# Altium PCB main_ADC_PCB.PcbDoc (part 8 of 8)
Units mm, origin at the board's own origin, x right, y up, seen from the top; angles counter-clockwise.
Board outline 150 x 100 mm, 4 copper layers (Top Layer, Layer 1, Layer 2, Bottom Layer), stack 1.62 mm thick; 535 components, 354 nets, 1725 pads, 1075 vias.
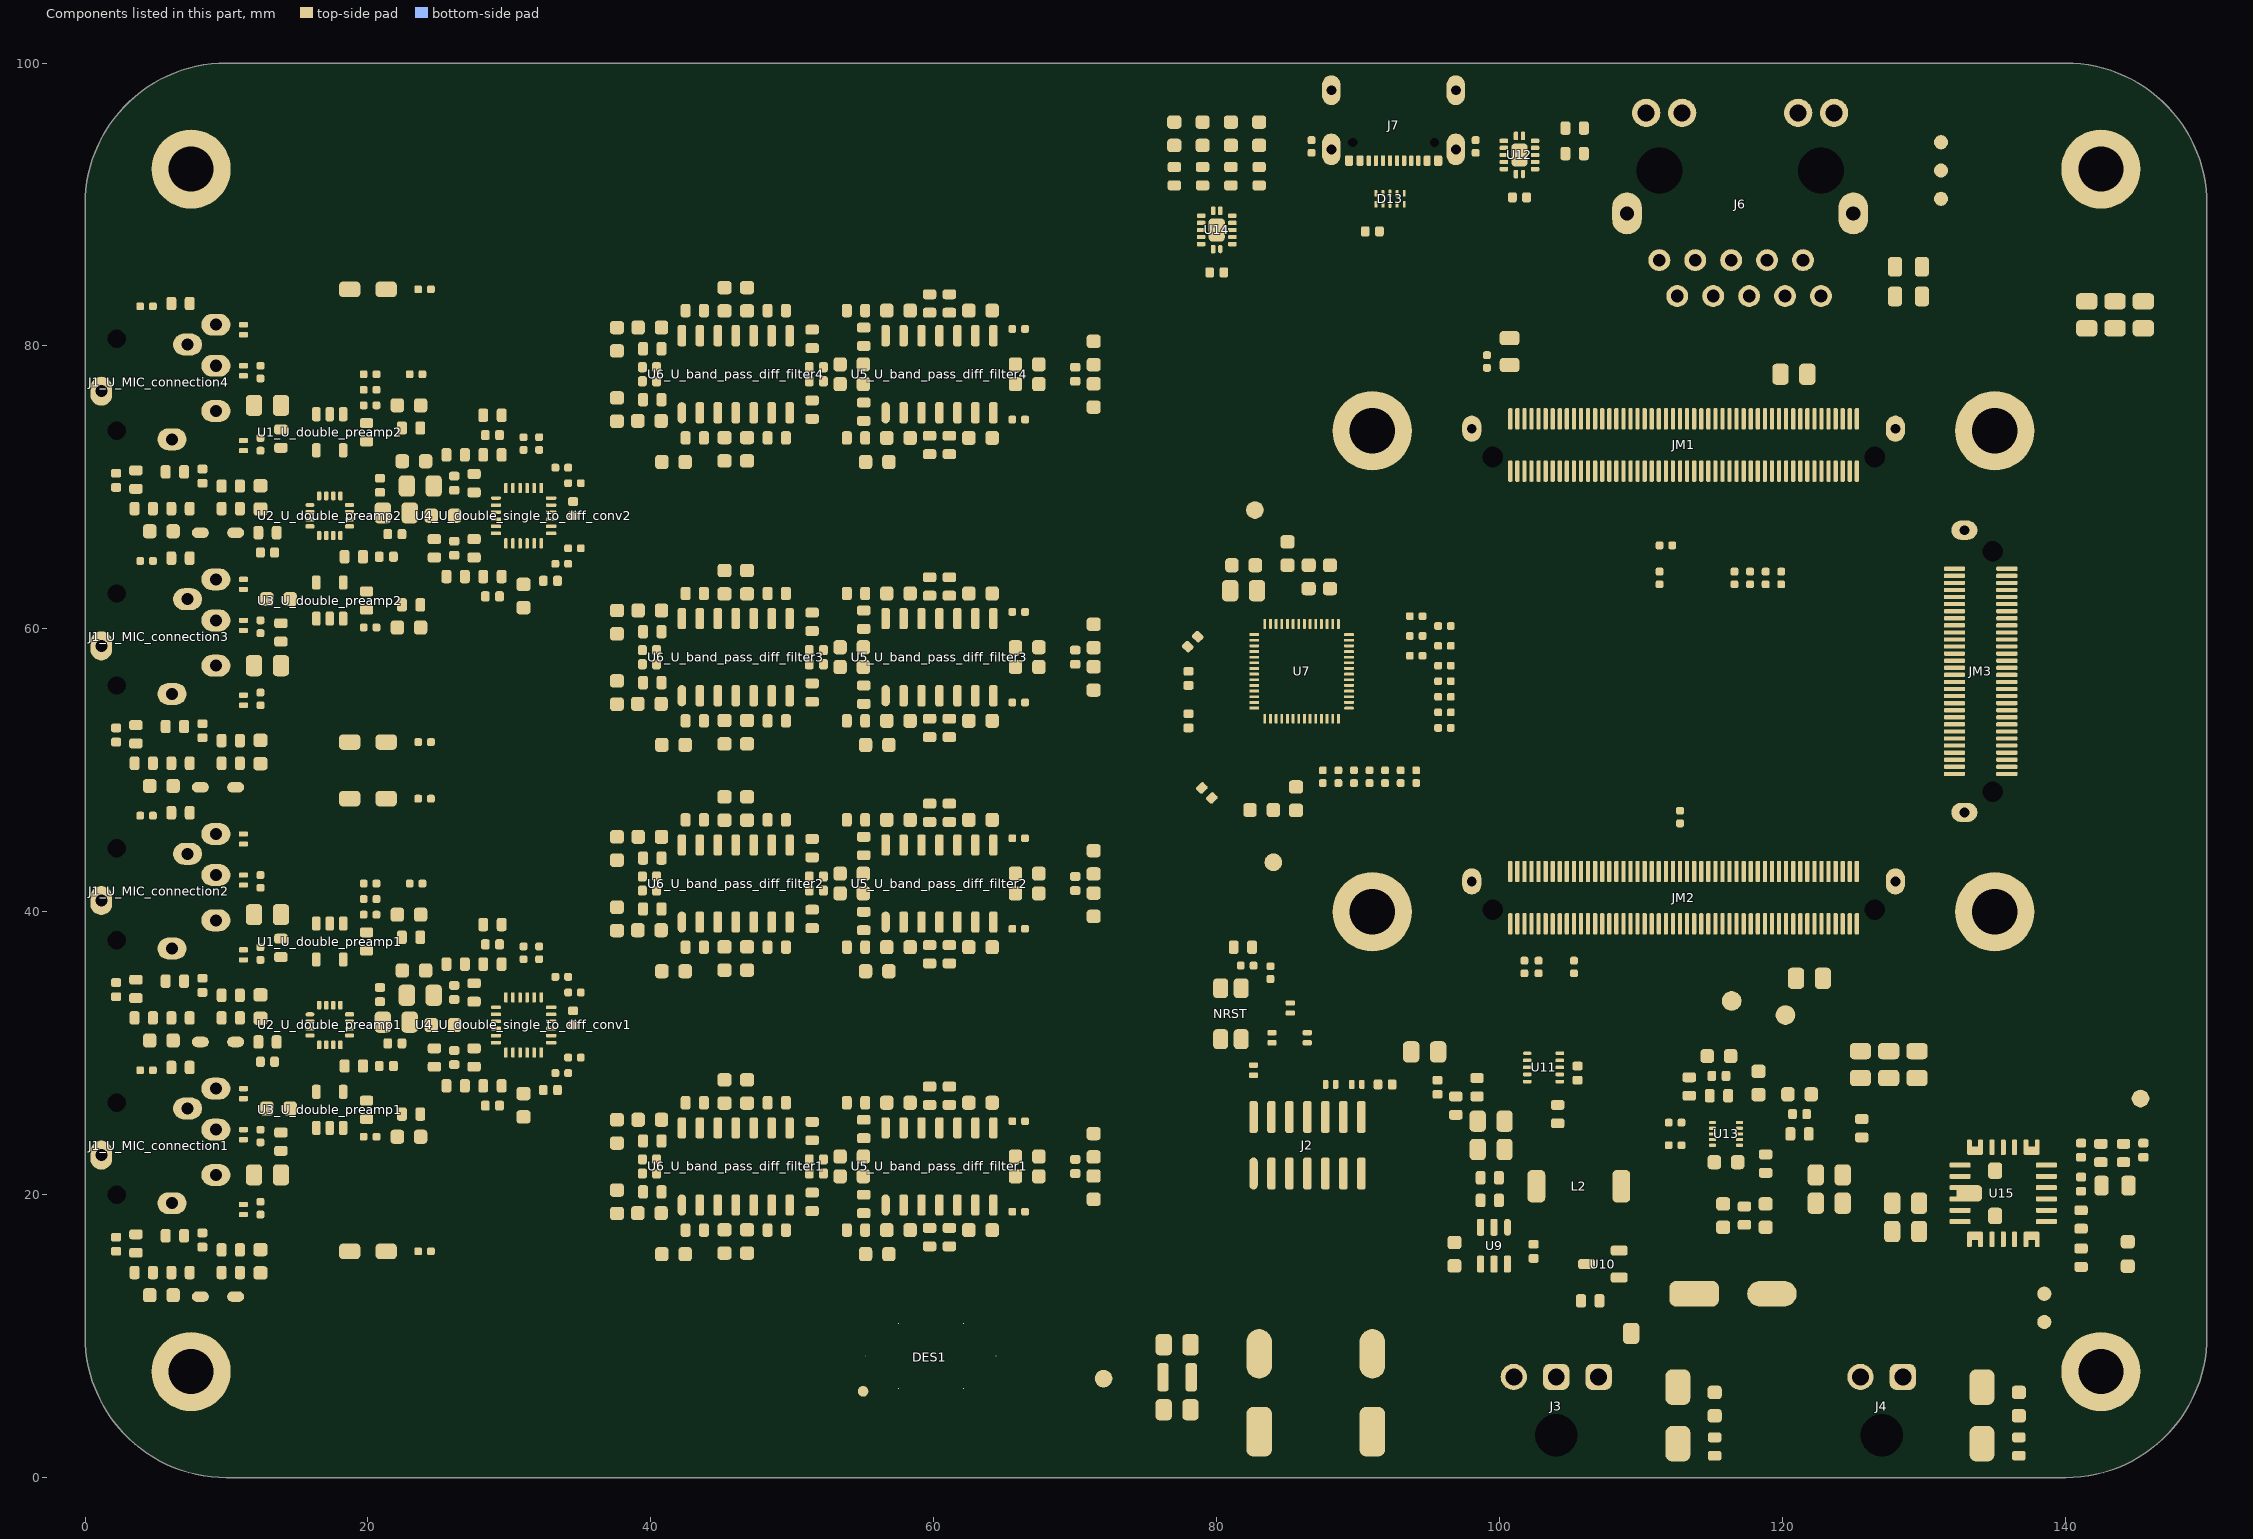
[diagram p10: the components of this part, seen from the top]

## Polygon pours and split planes (outlines as drawn) (continued)
12V_MIC on Layer 1 "12V_MIC_L02_P378" (solid, pour order 378): 2.3,29.2 3.1,29.2 cw(c3.1,28.9) 3.4,28.9 3.4,28.7 cw(c3.1,28.7) 3.1,28.4 2.3,28.4 cw(c2.3,28.7) 2,28.7 2,28.9 cw(c2.3,28.9)
12V_MIC on Layer 1 "12V_MIC_L02_P377" (solid, pour order 377): 2.3,47.2 3.1,47.2 cw(c3.1,46.9) 3.4,46.9 3.4,46.7 cw(c3.1,46.7) 3.1,46.4 2.3,46.4 cw(c2.3,46.7) 2,46.7 2,46.9 cw(c2.3,46.9)
12V_MIC on Layer 1 "12V_MIC_L02_P376" (solid, pour order 376): 2.3,65.2 3.1,65.2 cw(c3.1,64.9) 3.4,64.9 3.4,64.7 cw(c3.1,64.7) 3.1,64.4 2.3,64.4 cw(c2.3,64.7) 2,64.7 2,64.9 cw(c2.3,64.9)
12V_MIC on Layer 1 "12V_MIC_L02_P375" (solid, pour order 375): 2.3,83.2 3.1,83.2 cw(c3.1,82.9) 3.4,82.9 3.4,82.7 cw(c3.1,82.7) 3.1,82.4 2.3,82.4 cw(c2.3,82.7) 2,82.7 2,82.9 cw(c2.3,82.9)
3.3VD on Layer 1 "3.3VD_L02_P374" (solid, pour order 374): 32.5,55.1 32.5,54.2 ccw(c32.9,54.2) 32.9,53.8 34.5,53.8 ccw(c34.5,54.2) 34.9,54.2 34.9,55.1 ccw(c34.5,55.1) 34.5,55.5 32.9,55.5 ccw(c32.9,55.1)
3.3VD on Layer 1 "3.3VD_L02_P373" (solid, pour order 373): 32.5,45.8 32.5,44.9 ccw(c32.9,44.9) 32.9,44.5 34.5,44.5 ccw(c34.5,44.9) 34.9,44.9 34.9,45.8 ccw(c34.5,45.8) 34.5,46.2 32.9,46.2 ccw(c32.9,45.8)
VOCM on Layer 1 "VOCM_L02_P347" (solid, pour order 347): 54,81.4 54,80.2 cw(c53.7,80.2) 53.7,79.9 52.4,79.9 cw(c52.4,80.2) 52.1,80.2 52.1,81.4 cw(c52.4,81.4) 52.4,81.7 53.7,81.7 cw(c53.7,81.4)
VOCM on Layer 1 "VOCM_L02_P346" (solid, pour order 346): 54,74.6 54,75.8 ccw(c53.7,75.8) 53.7,76.1 52.4,76.1 ccw(c52.4,75.8) 52.1,75.8 52.1,74.6 ccw(c52.4,74.6) 52.4,74.3 53.7,74.3 ccw(c53.7,74.6)
VOCM on Layer 1 "VOCM_L02_P344" (solid, pour order 344): 66,79.8 66,80.2 cw(c66.3,80.2) 66.3,80.5 67.5,80.5 cw(c67.5,80.2) 67.8,80.2 67.8,79.8 cw(c67.5,79.8) 67.5,79.5 66.3,79.5 cw(c66.3,79.8)
VOCM on Layer 1 "VOCM_L02_P325" (solid, pour order 325): 66,75.8 66,76.2 cw(c66.3,76.2) 66.3,76.5 67.5,76.5 cw(c67.5,76.2) 67.8,76.2 67.8,75.8 cw(c67.5,75.8) 67.5,75.5 66.3,75.5 cw(c66.3,75.8)
VOCM on Layer 1 "VOCM_L02_P324" (solid, pour order 324): 38.3,78.9 38.7,78.9 cw(c38.7,78.6) 39,78.6 39,77.4 cw(c38.7,77.4) 38.7,77.1 38.3,77.1 cw(c38.3,77.4) 38,77.4 38,78.6 cw(c38.3,78.6)
VOCM on Layer 1 "VOCM_L02_P323" (solid, pour order 323): 83.6,51.4 84.4,51.4 cw(c84.4,51.1) 84.7,51.1 84.7,49.1 cw(c84.4,49.1) 84.4,48.8 83.6,48.8 cw(c83.6,49.1) 83.3,49.1 83.3,51.1 cw(c83.6,51.1)
VOCM on Layer 1 "VOCM_L02_P322" (solid, pour order 322): 39.4,69.4 39.6,69.4 cw(c39.6,69.1) 39.9,69.1 39.9,66.9 cw(c39.6,66.9) 39.6,66.6 39.4,66.6 cw(c39.4,66.9) 39.1,66.9 39.1,69.1 cw(c39.4,69.1)
VOCM on Layer 1 "VOCM_L02_P321" (solid, pour order 321): 35.3,69.4 35.5,69.4 cw(c35.5,69.1) 35.8,69.1 35.8,66.9 cw(c35.5,66.9) 35.5,66.6 35.3,66.6 cw(c35.3,66.9) 35,66.9 35,69.1 cw(c35.3,69.1)
VOCM on Layer 1 "VOCM_L02_P320" (solid, pour order 320): 19.3,27.8 19.3,28.2 cw(c19.6,28.2) 19.6,28.5 20.8,28.5 cw(c20.8,28.2) 21.1,28.2 21.1,27.8 cw(c20.8,27.8) 20.8,27.5 19.6,27.5 cw(c19.6,27.8)
VOCM on Layer 1 "VOCM_L02_P315" (solid, pour order 315): 19.3,27.8 19.3,28.2 cw(c19.6,28.2) 19.6,28.5 20.8,28.5 cw(c20.8,28.2) 21.1,28.2 21.1,27.8 cw(c20.8,27.8) 20.8,27.5 19.6,27.5 cw(c19.6,27.8)
VOCM on Layer 1 "VOCM_L02_P314" (solid, pour order 314): 39.4,33.4 39.6,33.4 cw(c39.6,33.1) 39.9,33.1 39.9,30.9 cw(c39.6,30.9) 39.6,30.6 39.4,30.6 cw(c39.4,30.9) 39.1,30.9 39.1,33.1 cw(c39.4,33.1)
VOCM on Layer 1 "VOCM_L02_P310" (solid, pour order 310): 35.3,33.4 35.5,33.4 cw(c35.5,33.1) 35.8,33.1 35.8,30.9 cw(c35.5,30.9) 35.5,30.6 35.3,30.6 cw(c35.3,30.9) 35,30.9 35,33.1 cw(c35.3,33.1)
12V_MIC on Layer 1 "12V_MIC_L02_P309" (solid, pour order 309): 8.3,65.4 8.3,65.8 cw(c8.6,65.8) 8.6,66.1 9.8,66.1 cw(c9.8,65.8) 10.1,65.8 10.1,65.4 cw(c9.8,65.4) 9.8,65.1 8.6,65.1 cw(c8.6,65.4)
VOCM on Layer 1 "VOCM_L02_P308" (solid, pour order 308): 54,25.4 54,24.2 cw(c53.7,24.2) 53.7,23.9 52.4,23.9 cw(c52.4,24.2) 52.1,24.2 52.1,25.4 cw(c52.4,25.4) 52.4,25.7 53.7,25.7 cw(c53.7,25.4)
VOCM on Layer 1 "VOCM_L02_P307" (solid, pour order 307): 54,18.6 54,19.8 ccw(c53.7,19.8) 53.7,20.1 52.4,20.1 ccw(c52.4,19.8) 52.1,19.8 52.1,18.6 ccw(c52.4,18.6) 52.4,18.3 53.7,18.3 ccw(c53.7,18.6)
VOCM on Layer 1 "VOCM_L02_P260" (solid, pour order 260): 66,23.8 66,24.2 cw(c66.3,24.2) 66.3,24.5 67.5,24.5 cw(c67.5,24.2) 67.8,24.2 67.8,23.8 cw(c67.5,23.8) 67.5,23.5 66.3,23.5 cw(c66.3,23.8)
VOCM on Layer 1 "VOCM_L02_P252" (solid, pour order 252): 66,19.8 66,20.2 cw(c66.3,20.2) 66.3,20.5 67.5,20.5 cw(c67.5,20.2) 67.8,20.2 67.8,19.8 cw(c67.5,19.8) 67.5,19.5 66.3,19.5 cw(c66.3,19.8)
VOCM on Layer 1 "VOCM_L02_P251" (solid, pour order 251): 38.3,22.9 38.7,22.9 cw(c38.7,22.6) 39,22.6 39,21.4 cw(c38.7,21.4) 38.7,21.1 38.3,21.1 cw(c38.3,21.4) 38,21.4 38,22.6 cw(c38.3,22.6)
VOCM on Layer 1 "VOCM_L02_P250" (solid, pour order 250): 54,45.4 54,44.2 cw(c53.7,44.2) 53.7,43.9 52.4,43.9 cw(c52.4,44.2) 52.1,44.2 52.1,45.4 cw(c52.4,45.4) 52.4,45.7 53.7,45.7 cw(c53.7,45.4)
VOCM on Layer 1 "VOCM_L02_P249" (solid, pour order 249): 54,38.6 54,39.8 ccw(c53.7,39.8) 53.7,40.1 52.4,40.1 ccw(c52.4,39.8) 52.1,39.8 52.1,38.6 ccw(c52.4,38.6) 52.4,38.3 53.7,38.3 ccw(c53.7,38.6)
VOCM on Layer 1 "VOCM_L02_P247" (solid, pour order 247): 66,43.8 66,44.2 cw(c66.3,44.2) 66.3,44.5 67.5,44.5 cw(c67.5,44.2) 67.8,44.2 67.8,43.8 cw(c67.5,43.8) 67.5,43.5 66.3,43.5 cw(c66.3,43.8)
VOCM on Layer 1 "VOCM_L02_P246" (solid, pour order 246): 66,39.8 66,40.2 cw(c66.3,40.2) 66.3,40.5 67.5,40.5 cw(c67.5,40.2) 67.8,40.2 67.8,39.8 cw(c67.5,39.8) 67.5,39.5 66.3,39.5 cw(c66.3,39.8)
VOCM on Layer 1 "VOCM_L02_P245" (solid, pour order 245): 38.3,42.9 38.7,42.9 cw(c38.7,42.6) 39,42.6 39,41.4 cw(c38.7,41.4) 38.7,41.1 38.3,41.1 cw(c38.3,41.4) 38,41.4 38,42.6 cw(c38.3,42.6)
VOCM on Layer 1 "VOCM_L02_P244" (solid, pour order 244): 54,61.4 54,60.2 cw(c53.7,60.2) 53.7,59.9 52.4,59.9 cw(c52.4,60.2) 52.1,60.2 52.1,61.4 cw(c52.4,61.4) 52.4,61.7 53.7,61.7 cw(c53.7,61.4)
VOCM on Layer 1 "VOCM_L02_P243" (solid, pour order 243): 54,54.6 54,55.8 ccw(c53.7,55.8) 53.7,56.1 52.4,56.1 ccw(c52.4,55.8) 52.1,55.8 52.1,54.6 ccw(c52.4,54.6) 52.4,54.3 53.7,54.3 ccw(c53.7,54.6)
VOCM on Layer 1 "VOCM_L02_P241" (solid, pour order 241): 66,59.8 66,60.2 cw(c66.3,60.2) 66.3,60.5 67.5,60.5 cw(c67.5,60.2) 67.8,60.2 67.8,59.8 cw(c67.5,59.8) 67.5,59.5 66.3,59.5 cw(c66.3,59.8)
VOCM on Layer 1 "VOCM_L02_P240" (solid, pour order 240): 66,55.8 66,56.2 cw(c66.3,56.2) 66.3,56.5 67.5,56.5 cw(c67.5,56.2) 67.8,56.2 67.8,55.8 cw(c67.5,55.8) 67.5,55.5 66.3,55.5 cw(c66.3,55.8)
VOCM on Layer 1 "VOCM_L02_P239" (solid, pour order 239): 38.3,58.9 38.7,58.9 cw(c38.7,58.6) 39,58.6 39,57.4 cw(c38.7,57.4) 38.7,57.1 38.3,57.1 cw(c38.3,57.4) 38,57.4 38,58.6 cw(c38.3,58.6)
3.3VD on Layer 1 "3.3VD_L02_P238" (solid, pour order 238): 77.6,85.6 78.4,85.6 cw(c78.4,85.3) 78.7,85.3 78.7,85.1 cw(c78.4,85.1) 78.4,84.8 77.6,84.8 cw(c77.6,85.1) 77.3,85.1 77.3,85.3 cw(c77.6,85.3)
3.3VD on Layer 1 "3.3VD_L02_P237" (solid, pour order 237): 120.6,73.8 122.4,73.8 cw(c122.4,73.5) 122.7,73.5 122.7,72.5 cw(c122.4,72.5) 122.4,72.2 120.6,72.2 cw(c120.6,72.5) 120.3,72.5 120.3,73.5 cw(c120.6,73.5)
12V_MIC on Layer 1 "12V_MIC_L02_P235" (solid, pour order 235): 74,8.2 75.2,8.2 cw(c75.2,7.9) 75.5,7.9 75.5,4.1 cw(c75.2,4.1) 75.2,3.8 74,3.8 cw(c74,4.1) 73.7,4.1 73.7,7.9 cw(c74,7.9)
5VIN on Layer 1 "5VIN_L02_P199" (solid, pour order 199): 127.5,10.6 131.8,10.6 cw(c131.8,10.3) 132.1,10.3 132.1,6.3 cw(c131.6,6.3) 131.6,5.8 127.6,5.8 cw(c127.6,6.2) 127.2,6.2 127.2,10.3 cw(c127.5,10.3)
12VIN on Layer 1 "12VIN_L02_P188" (solid, pour order 188): 106.1,8.5 108.7,8.5 110.1,8.5 cw(c110.1,8) 110.6,8 110.6,6.3 cw(c110.1,6.3) 110.1,5.8 106.1,5.8 cw(c106.1,6.2) 105.7,6.2 105.7,8.1 cw(c106.1,8.1)
ETH_GND on Layer 1 "ETH_GND_L02_P180" (solid, pour order 180): 108,99.5 126,99.5 cw(c126,97) 128.5,97 128.5,83 cw(c126,83) 126,80.5 108,80.5 cw(c108,83) 105.5,83 105.5,97 cw(c108,97)
GND on Bottom Layer "GND_L04_P459" (solid, remove dead copper, pour order 459): 17 vertices, not listed, extent 1,1 149,99
5VA on Bottom Layer "5VA_L04_P076" (solid, pour order 76): 84.8,63.9 85.2,63.9 cw(c85.2,63.6) 85.5,63.6 85.5,62.2 cw(c85.2,62.2) 85.2,61.9 84.8,61.9 cw(c84.8,62.2) 84.5,62.2 84.5,63.6 cw(c84.8,63.6)
5VA on Bottom Layer "NONET_L03_P-001" (solid, pour order 146): 85.5,49.2 85.7,49.2 ccw(c85.7,49.5) 86,49.5 86,51.5 ccw(c85.7,51.5) 85.7,51.8 85.5,51.8 ccw(c85.5,51.5) 85.2,51.5 85.2,49.5 ccw(c85.5,49.5)
1.8VD on Bottom Layer "1.8VD_L04_P147" (solid, pour order 147): 122.4,46.3 123,46.3 cw(c123,46) 123.3,46 123.3,45.4 cw(c123,45.4) 123,45.1 122.4,45.1 cw(c122.4,45.4) 122.1,45.4 122.1,46 cw(c122.4,46)
ETH_GND on Bottom Layer "ETH_GND_L04_P164" (solid, pour order 164): 108,99.5 126,99.5 cw(c126,97) 128.5,97 128.5,83 cw(c126,83) 126,80.5 108,80.5 cw(c108,83) 105.5,83 105.5,97 cw(c108,97)
5VA on Bottom Layer "5VA_L04_P197" (solid, pour order 197): 20.2,35.7 20.2,35.9 cw(c20.5,35.9) 20.5,36.2 21.4,36.2 cw(c21.4,35.9) 21.7,35.9 21.7,35.7 cw(c21.4,35.7) 21.4,35.4 20.5,35.4 cw(c20.5,35.7)
5VA on Bottom Layer "5VA_L04_P194" (solid, pour order 194): 19.2,66.5 19.2,66.7 cw(c19.5,66.7) 19.5,67 20.4,67 cw(c20.4,66.7) 20.7,66.7 20.7,66.5 cw(c20.4,66.5) 20.4,66.2 19.5,66.2 cw(c19.5,66.5)
5VA on Bottom Layer "5VA_L04_P293" (solid, pour order 293): 43.125,71.4 43.125,72.2 cw(c43.425,72.2) 43.425,72.5 43.625,72.5 cw(c43.625,72.2) 43.925,72.2 43.925,71.4 cw(c43.625,71.4) 43.625,71.1 43.425,71.1 cw(c43.425,71.4)
5VA on Bottom Layer "5VA_L04_P209" (solid, pour order 209): 60,76.7 60,77.5 cw(c60.3,77.5) 60.3,77.8 60.5,77.8 cw(c60.5,77.5) 60.8,77.5 60.8,76.7 cw(c60.5,76.7) 60.5,76.4 60.3,76.4 cw(c60.3,76.7)
5VA on Bottom Layer "5VA_L04_P296" (solid, pour order 296): 57.525,71.4 57.525,72.2 cw(c57.825,72.2) 57.825,72.5 58.025,72.5 cw(c58.025,72.2) 58.325,72.2 58.325,71.4 cw(c58.025,71.4) 58.025,71.1 57.825,71.1 cw(c57.825,71.4)
5VA on Bottom Layer "5VA_L04_P210" (solid, pour order 210): 45.6,76.7 45.6,77.5 cw(c45.9,77.5) 45.9,77.8 46.1,77.8 cw(c46.1,77.5) 46.4,77.5 46.4,76.7 cw(c46.1,76.7) 46.1,76.4 45.9,76.4 cw(c45.9,76.7)
5VA on Bottom Layer "5VA_L04_P291" (solid, pour order 291): 43.125,51.4 43.125,52.2 cw(c43.425,52.2) 43.425,52.5 43.625,52.5 cw(c43.625,52.2) 43.925,52.2 43.925,51.4 cw(c43.625,51.4) 43.625,51.1 43.425,51.1 cw(c43.425,51.4)
5VA on Bottom Layer "5VA_L04_P214" (solid, pour order 214): 60,56.7 60,57.5 cw(c60.3,57.5) 60.3,57.8 60.5,57.8 cw(c60.5,57.5) 60.8,57.5 60.8,56.7 cw(c60.5,56.7) 60.5,56.4 60.3,56.4 cw(c60.3,56.7)
5VA on Bottom Layer "5VA_L04_P292" (solid, pour order 292): 57.525,51.4 57.525,52.2 cw(c57.825,52.2) 57.825,52.5 58.025,52.5 cw(c58.025,52.2) 58.325,52.2 58.325,51.4 cw(c58.025,51.4) 58.025,51.1 57.825,51.1 cw(c57.825,51.4)
5VA on Bottom Layer "5VA_L04_P211" (solid, pour order 211): 46.4,57.5 46.4,56.7 cw(c46.1,56.7) 46.1,56.4 45.9,56.4 cw(c45.9,56.7) 45.6,56.7 45.6,57.5 cw(c45.9,57.5) 45.9,57.8 46.1,57.8 cw(c46.1,57.5)
5VA on Bottom Layer "5VA_L04_P287" (solid, pour order 287): 42.9,35.4 42.9,36.2 cw(c43.2,36.2) 43.2,36.5 43.4,36.5 cw(c43.4,36.2) 43.7,36.2 43.7,35.4 cw(c43.4,35.4) 43.4,35.1 43.2,35.1 cw(c43.2,35.4)
5VA on Bottom Layer "5VA_L04_P223" (solid, pour order 223): 60,40.7 60,41.5 cw(c60.3,41.5) 60.3,41.8 60.5,41.8 cw(c60.5,41.5) 60.8,41.5 60.8,40.7 cw(c60.5,40.7) 60.5,40.4 60.3,40.4 cw(c60.3,40.7)
5VA on Bottom Layer "5VA_L04_P289" (solid, pour order 289): 57.525,35.4 57.525,36.2 cw(c57.825,36.2) 57.825,36.5 58.025,36.5 cw(c58.025,36.2) 58.325,36.2 58.325,35.4 cw(c58.025,35.4) 58.025,35.1 57.825,35.1 cw(c57.825,35.4)
5VA on Bottom Layer "5VA_L04_P215" (solid, pour order 215): 45.6,40.7 45.6,41.5 cw(c45.9,41.5) 45.9,41.8 46.1,41.8 cw(c46.1,41.5) 46.4,41.5 46.4,40.7 cw(c46.1,40.7) 46.1,40.4 45.9,40.4 cw(c45.9,40.7)
5VA on Bottom Layer "5VA_L04_P285" (solid, pour order 285): 43.125,15.4 43.125,16.2 cw(c43.425,16.2) 43.425,16.5 43.625,16.5 cw(c43.625,16.2) 43.925,16.2 43.925,15.4 cw(c43.625,15.4) 43.625,15.1 43.425,15.1 cw(c43.425,15.4)
5VA on Bottom Layer "5VA_L04_P254" (solid, pour order 254): 60.8,21.5 60.8,20.7 cw(c60.5,20.7) 60.5,20.4 60.3,20.4 cw(c60.3,20.7) 60,20.7 60,21.5 cw(c60.3,21.5) 60.3,21.8 60.5,21.8 cw(c60.5,21.5)
5VA on Bottom Layer "5VA_L04_P283" (solid, pour order 283): 57.525,15.4 57.525,16.2 cw(c57.825,16.2) 57.825,16.5 58.025,16.5 cw(c58.025,16.2) 58.325,16.2 58.325,15.4 cw(c58.025,15.4) 58.025,15.1 57.825,15.1 cw(c57.825,15.4)
5VA on Bottom Layer "5VA_L04_P226" (solid, pour order 226): 46.4,21.5 46.4,20.7 cw(c46.1,20.7) 46.1,20.4 45.9,20.4 cw(c45.9,20.7) 45.6,20.7 45.6,21.5 cw(c45.9,21.5) 45.9,21.8 46.1,21.8 cw(c46.1,21.5)
5VA on Bottom Layer "5VA_L04_P262" (solid, pour order 262): 13.6,63.1 13.6,63.5 cw(c13.9,63.5) 13.9,63.8 15.1,63.8 cw(c15.1,63.5) 15.4,63.5 15.4,63.1 cw(c15.1,63.1) 15.1,62.8 13.9,62.8 cw(c13.9,63.1)
5VA on Bottom Layer "5VA_L04_P193" (solid, pour order 193): 20.2,71.7 20.2,71.9 cw(c20.5,71.9) 20.5,72.2 21.4,72.2 cw(c21.4,71.9) 21.7,71.9 21.7,71.7 cw(c21.4,71.7) 21.4,71.4 20.5,71.4 cw(c20.5,71.7)
3.3VD on Bottom Layer "3.3VD_L04_P277" (solid, pour order 277): 21.7,70.9 21.8,70.9 cw(c21.8,70.6) 22.1,70.6 22.1,69.6 cw(c21.8,69.6) 21.8,69.3 21.7,69.3 cw(c21.7,69.6) 21.4,69.6 21.4,70.6 cw(c21.7,70.6)
5VA on Bottom Layer "5VA_L04_P196" (solid, pour order 196): 31.1,63.8 30.9,63.8 cw(c30.9,64.1) 30.6,64.1 30.6,65 cw(c30.9,65) 30.9,65.3 31.1,65.3 cw(c31.1,65) 31.4,65 31.4,64.1 cw(c31.1,64.1)
5VA on Bottom Layer "5VA_L04_P195" (solid, pour order 195): 26.8,67.9 26.8,68.1 cw(c27.1,68.1) 27.1,68.4 28,68.4 cw(c28,68.1) 28.3,68.1 28.3,67.9 cw(c28,67.9) 28,67.6 27.1,67.6 cw(c27.1,67.9)
VOCM on Bottom Layer "VOCM_L04_P261" (solid, pour order 261): 19.3,63.8 19.3,64.2 cw(c19.6,64.2) 19.6,64.5 20.8,64.5 cw(c20.8,64.2) 21.1,64.2 21.1,63.8 cw(c20.8,63.8) 20.8,63.5 19.6,63.5 cw(c19.6,63.8)
3.3VD on Bottom Layer "3.3VD_L04_P265" (solid, pour order 265): 21.7,34.9 21.8,34.9 cw(c21.8,34.6) 22.1,34.6 22.1,33.6 cw(c21.8,33.6) 21.8,33.3 21.7,33.3 cw(c21.7,33.6) 21.4,33.6 21.4,34.6 cw(c21.7,34.6)
5VA on Bottom Layer "5VA_L04_P264" (solid, pour order 264): 13.6,27.1 13.6,27.5 cw(c13.9,27.5) 13.9,27.8 15.1,27.8 cw(c15.1,27.5) 15.4,27.5 15.4,27.1 cw(c15.1,27.1) 15.1,26.8 13.9,26.8 cw(c13.9,27.1)
5VA on Bottom Layer "5VA_L04_P201" (solid, pour order 201): 31.1,27.8 30.9,27.8 cw(c30.9,28.1) 30.6,28.1 30.6,29 cw(c30.9,29) 30.9,29.3 31.1,29.3 cw(c31.1,29) 31.4,29 31.4,28.1 cw(c31.1,28.1)
5VA on Bottom Layer "5VA_L04_P200" (solid, pour order 200): 26.8,31.9 26.8,32.1 cw(c27.1,32.1) 27.1,32.4 28,32.4 cw(c28,32.1) 28.3,32.1 28.3,31.9 cw(c28,31.9) 28,31.6 27.1,31.6 cw(c27.1,31.9)
5VA on Bottom Layer "5VA_L04_P198" (solid, pour order 198): 19.2,30.5 19.2,30.7 cw(c19.5,30.7) 19.5,31 20.4,31 cw(c20.4,30.7) 20.7,30.7 20.7,30.5 cw(c20.4,30.5) 20.4,30.2 19.5,30.2 cw(c19.5,30.5)
3.3VD on Bottom Layer "3.3VD_L04_P207" (solid, pour order 207): 79.1,37.4 79.1,37.6 cw(c79.4,37.6) 79.4,37.9 80.3,37.9 cw(c80.3,37.6) 80.6,37.6 80.6,37.4 cw(c80.3,37.4) 80.3,37.1 79.4,37.1 cw(c79.4,37.4)
1.8VD on Bottom Layer "1.8VD_L04_P256" (solid, pour order 256): 89.3,63.5 89.9,63.5 cw(c89.9,63.2) 90.2,63.2 90.2,62.6 cw(c89.9,62.6) 89.9,62.3 89.3,62.3 cw(c89.3,62.6) 89,62.6 89,63.2 cw(c89.3,63.2)
3.3VD on Bottom Layer "3.3VD_L04_P458" (solid, pour order 458): 78.4,84.8 77.6,84.8 cw(c77.6,85.1) 77.3,85.1 77.3,85.3 cw(c77.6,85.3) 77.6,85.6 78.4,85.6 cw(c78.4,85.3) 78.7,85.3 78.7,85.1 cw(c78.4,85.1)
3.3VD on Bottom Layer "3.3VD_L04_P192" (solid, pour order 192): 101.9,81.3 102.1,81.3 cw(c102.1,81) 102.4,81 102.4,80.1 cw(c102.1,80.1) 102.1,79.8 101.9,79.8 cw(c101.9,80.1) 101.6,80.1 101.6,81 cw(c101.9,81)
3.3VD on Bottom Layer "3.3VD_L04_P203" (solid, pour order 203): 99.8,90.1 99,90.1 cw(c99,90.4) 98.7,90.4 98.7,90.6 cw(c99,90.6) 99,90.9 99.8,90.9 cw(c99.8,90.6) 100.1,90.6 100.1,90.4 cw(c99.8,90.4)
3.3VD on Bottom Layer "3.3VD_L04_P202" (solid, pour order 202): 123.3,63.2 123.3,63 cw(c123,63) 123,62.7 120.7,62.7 cw(c120.7,63) 120.4,63 120.4,63.2 cw(c120.7,63.2) 120.7,63.5 123,63.5 cw(c123,63.2)
3.3VD on Bottom Layer "3.3VD_L04_P191" (solid, pour order 191): 124.3,46.4 125.8,46.4 cw(c125.8,46.2) 126,46.2 126,44 cw(c125.8,44) 125.8,43.8 124.3,43.8 cw(c124.3,44) 124.1,44 124.1,46.2 cw(c124.3,46.2)
5VA on Bottom Layer "5VA_L04_P190" (solid, pour order 190): 97.2,31.2 99.5,31.2 cw(c99.5,30.9) 99.8,30.9 99.8,29.3 cw(c99.5,29.3) 99.5,29 97.2,29 cw(c97.2,29.3) 96.9,29.3 96.9,30.9 cw(c97.2,30.9)
1.8VD on Bottom Layer "1.8VD_L04_P186" (solid, pour order 186): 119.6,30.8 120.8,30.8 cw(c120.8,30.5) 121.1,30.5 121.1,28.1 cw(c120.8,28.1) 120.8,27.8 119.6,27.8 cw(c119.6,28.1) 119.3,28.1 119.3,30.5 cw(c119.6,30.5)
5VD on Bottom Layer "5VD_L04_P279" (solid, pour order 279): 117.8,26.5 118.8,26.5 cw(c118.8,26.2) 119.1,26.2 119.1,24.8 cw(c118.8,24.8) 118.8,24.5 117.8,24.5 cw(c117.8,24.8) 117.5,24.8 117.5,26.2 cw(c117.8,26.2)
3.3VD on Bottom Layer "3.3VD_L04_P189" (solid, pour order 189): 114,31.9 114,30.9 ccw(c114.3,30.9) 114.3,30.6 116.9,30.6 ccw(c116.9,30.9) 117.2,30.9 117.2,31.9 ccw(c116.9,31.9) 116.9,32.2 114.3,32.2 ccw(c114.3,31.9)
5VD on Bottom Layer "5VD_L04_P281" (solid, pour order 281): 112.3,20 112.3,19 ccw(c112.6,19) 112.6,18.7 114.8,18.7 ccw(c114.8,19) 115.1,19 115.1,20 ccw(c114.8,20) 114.8,20.3 112.6,20.3 ccw(c112.6,20)
3.3VD on Bottom Layer "3.3VD_L04_P455" (solid, pour order 455): 32.5,55.1 32.5,54.2 ccw(c32.9,54.2) 32.9,53.8 34.5,53.8 ccw(c34.5,54.2) 34.9,54.2 34.9,55.1 ccw(c34.5,55.1) 34.5,55.5 32.9,55.5 ccw(c32.9,55.1)
3.3VD on Bottom Layer "3.3VD_L04_P411" (solid, pour order 411): 32.5,45.8 32.5,44.9 ccw(c32.9,44.9) 32.9,44.5 34.5,44.5 ccw(c34.5,44.9) 34.9,44.9 34.9,45.8 ccw(c34.5,45.8) 34.5,46.2 32.9,46.2 ccw(c32.9,45.8)
VOCM on Bottom Layer "VOCM_L04_P387" (solid, pour order 387): 19 vertices, not listed, extent 18.6,24.5 25.1,31.3
VOCM on Bottom Layer "VOCM_L04_P345" (solid, pour order 345): 29.248,60.552 29.248,60.248 cw(c28.9,60.248) 28.9,59.9 27.6,59.9 cw(c27.6,60.2) 27.3,60.2 27.3,60.6 cw(c27.6,60.6) 27.6,60.9 28.9,60.9 cw(c28.9,60.552)
VOCM on Bottom Layer "VOCM_L04_P343" (solid, pour order 343): 65.8,56.7 68.1,56.7 68.1,51.9 ccw(c68.5,51.9) 68.5,51.5 84.3,51.5 cw(c84.3,51.1) 84.7,51.1 84.7,48.9 cw(c84.3,48.9) 84.3,48.5 68.5,48.5 ccw(c68.5,48.1) 68.1,48.1 68.1,43.5 65.8,43.5
VOCM on Bottom Layer "VOCM_L04_P302" (solid, pour order 302): 35 vertices, not listed, extent 38,18.3 54,45.7
VOCM on Bottom Layer "VOCM_L04_P299" (solid, pour order 299): 25 vertices, not listed, extent 52.1,18.3 68.1,45.7
VOCM on Bottom Layer "VOCM_L04_P297" (solid, pour order 297): 25 vertices, not listed, extent 52.1,54.3 68.1,81.7
VOCM on Bottom Layer "VOCM_L04_P298" (solid, pour order 298): 35 vertices, not listed, extent 38,54.3 54,81.7
12V_MIC on Bottom Layer "12V_MIC_L04_P173" (solid, pour order 173): 30 vertices, not listed, extent 2,36.6 10.5,64
12V_MIC on Bottom Layer "12V_MIC_L04_P182" (solid, pour order 182): 30 vertices, not listed, extent 2,18.6 10.5,46
12V_MIC on Bottom Layer "12V_MIC_L04_P174" (solid, pour order 174): 30 vertices, not listed, extent 2,54.9 10.5,82
12V_MIC on Bottom Layer "12V_MIC_L04_P185" (solid, pour order 185): 75.5,7.9 75.5,4.1 cw(c75.2,4.1) 75.2,3.8 19.8,3.8 cw(c19.8,6.214) 18.093,4.507 12.307,10.293 ccw(c10.6,8.587) 10.6,11 10.5,11 10.5,16.5 11.493,16.5 cw(c11.493,14.07) 13.212,15.788 20.093,8.907 ccw(c21.8,10.614) 21.8,8.2 75.2,8.2 cw(c75.2,7.9)
12V_MIC on Bottom Layer "12V_MIC_L04_P181" (solid, pour order 181): 18 vertices, not listed, extent 2,11 11.6,28
12V_MIC on Bottom Layer "12V_MIC_L04_P175" (solid, pour order 175): 17 vertices, not listed, extent 2,72 5.9,83.5
5VD on Bottom Layer "5VD_L04_P172" (solid, pour order 172): 112.6,18.7 118.8,18.7 ccw(c118.8,19) 119.1,19 119.1,26.3 ccw(c118.8,26.3) 118.8,26.6 117.8,26.6 ccw(c117.8,26.3) 117.5,26.3 117.5,20.6 cw(c117.2,20.6) 117.2,20.3 112.6,20.3 ccw(c112.6,20) 112.3,20 112.3,19 ccw(c112.6,19)
5VIN on Bottom Layer "5VIN_L04_P171" (solid, pour order 171): 127.5,10.6 131.8,10.6 cw(c131.8,10.3) 132.1,10.3 132.1,6.3 cw(c131.6,6.3) 131.6,5.8 127.6,5.8 cw(c127.6,6.2) 127.2,6.2 127.2,10.3 cw(c127.5,10.3)
12VIN on Bottom Layer "12VIN_L04_P169" (solid, pour order 169): 106.1,8.5 108.7,8.5 110.1,8.5 cw(c110.1,8) 110.6,8 110.6,6.3 cw(c110.1,6.3) 110.1,5.8 106.1,5.8 cw(c106.1,6.2) 105.7,6.2 105.7,8.1 cw(c106.1,8.1)
no net on Bottom Solder "NONET_L03_P-001" (solid, pour order 445): 12.3,97 23.2,97 cw(c23.2,96.5) 23.7,96.5 23.7,85.6 cw(c23.2,85.6) 23.2,85.1 12.3,85.1 cw(c12.3,85.6) 11.8,85.6 11.8,96.5 cw(c12.3,96.5)

## Other copper
Top Layer:
  pour cut-out: 33.405,69.987 35.352,69.987 ccw(c35.352,70.163) 35.528,70.163 35.528,69.428 cw(c35.5,69.428) 35.5,69.4 33.984,69.4 ccw(c33.984,69.256) 33.84,69.256 33.539,69.256
  pour cut-out: 33.405,33.987 35.352,33.987 ccw(c35.352,34.163) 35.528,34.163 35.528,33.428 cw(c35.5,33.428) 35.5,33.4 33.984,33.4 ccw(c33.984,33.256) 33.84,33.256 33.539,33.256
  pour cut-out: 35.532,29.837 35.532,30.368 cw(c35.56,30.368) 35.56,30.396 35.266,30.396 cw(c35.266,30.582) 35.08,30.582 ccw(c35.04,30.582) 35.04,30.623 34.361,30.623 cw(c34.361,30.946) 34.038,30.946 ccw(c33.961,30.946) 33.961,31.022 33.539,31.022 ccw(c33.539,30.955) 33.471,30.955 33.471,30.079 ccw(c33.638,30.079) 33.638,29.913 33.741,29.913 ccw(c33.741,30.061) 33.889,30.061 cw(c33.916,30.061) 33.916,30.088 34.401,30.088 cw(c34.401,29.984) 34.505,29.984 cw(c34.554,29.984) 34.554,30.034 35.093,30.034
  pour cut-out: 35.532,65.838 35.532,66.368 cw(c35.56,66.368) 35.56,66.396 35.266,66.396 cw(c35.266,66.582) 35.08,66.582 ccw(c35.04,66.582) 35.04,66.623 34.361,66.623 cw(c34.361,66.946) 34.038,66.946 ccw(c33.961,66.946) 33.961,67.022 33.539,67.022 ccw(c33.539,66.955) 33.471,66.955 33.471,66.079 ccw(c33.638,66.079) 33.638,65.913 33.741,65.913 ccw(c33.741,66.061) 33.889,66.061 cw(c33.916,66.061) 33.916,66.088 34.401,66.088 cw(c34.401,65.984) 34.505,65.984 cw(c34.554,65.984) 34.554,66.034 35.093,66.034
  pour cut-out: 34.15,28.6 34.981,29.431 35.505,29.431 36.892,28.044 ccw(c38.688,29.84) 38.688,27.3 39.1,27.3 39.1,26.952 cw(c36.56,26.952) 38.356,25.156 36.9,23.7 ccw(c37.866,22.734) 36.5,22.734 36.5,21.4 ccw(c35.776,21.4) 36.288,21.912 35.844,22.356 cw(c37.64,24.152) 35.1,24.152 35.1,26.845 ccw(c33.157,26.845) 34.531,28.219
  pour cut-out: 34.15,64.6 34.981,65.431 35.505,65.431 36.892,64.044 ccw(c38.688,65.84) 38.688,63.3 39.1,63.3 39.1,62.952 cw(c36.56,62.952) 38.356,61.156 36.9,59.7 ccw(c37.866,58.734) 36.5,58.734 36.5,57.4 ccw(c35.776,57.4) 36.288,57.912 35.844,58.356 cw(c37.64,60.152) 35.1,60.152 35.1,62.845 ccw(c33.157,62.845) 34.531,64.219
  pour cut-out: 34.15,35.4 34.981,34.569 35.505,34.569 36.892,35.956 cw(c38.688,34.16) 38.688,36.7 39.1,36.7 39.1,37.048 ccw(c36.56,37.048) 38.356,38.844 36.9,40.3 cw(c37.866,41.266) 36.5,41.266 36.5,42.6 cw(c35.776,42.6) 36.288,42.088 35.844,41.644 ccw(c37.64,39.848) 35.1,39.848 35.1,37.155 cw(c33.157,37.155) 34.531,35.781
  pour cut-out: 34.15,71.4 34.981,70.569 35.505,70.569 36.892,71.956 cw(c38.688,70.16) 38.688,72.7 39.1,72.7 39.1,73.048 ccw(c36.56,73.048) 38.356,74.844 36.9,76.3 cw(c37.866,77.266) 36.5,77.266 36.5,78.6 cw(c35.776,78.6) 36.288,78.088 35.844,77.644 ccw(c37.64,75.848) 35.1,75.848 35.1,73.155 cw(c33.157,73.155) 34.531,71.781
  pour cut-out: 90.4,62.5 104.569,62.5 cw(c104.569,59.769) 106.5,61.7 112.559,55.641 cw(c109.803,52.886) 113.7,52.886 113.7,45.7 cw(c113.1,45.7) 113.1,45.1 89.8,45.1 89.8,61.9
  pour cut-out: 94.5,42 95.7,42 95.7,38.6 99.045,35.255 103.1,35.255 103.1,34.5 ccw(c103.57,34.5) 103.57,34.03 103.9,34.03 103.9,33.7 98.7,33.7 94.9,37.5
  pour cut-out: 100.851,94.551 101.949,94.551 cw(c101.949,94.3) 102.2,94.3 102.2,92.7 cw(c101.95,92.7) 101.95,92.45 100.85,92.45 cw(c100.85,92.7) 100.6,92.7 100.6,94.3 cw(c100.851,94.3)
  pour cut-out: 79.451,89.251 80.549,89.251 cw(c80.549,89) 80.8,89 80.8,87.4 cw(c80.55,87.4) 80.55,87.15 79.45,87.15 cw(c79.45,87.4) 79.2,87.4 79.2,89 cw(c79.451,89)
  pour cut-out: 102.6,27.7 103.6,27.7 ccw(c103.6,28) 103.9,28 103.9,29.9 ccw(c103.6,29.9) 103.6,30.2 102.6,30.2 ccw(c102.6,29.9) 102.3,29.9 102.3,28 ccw(c102.6,28)
  pour cut-out: 115.5,25.3 116.5,25.3 cw(c116.5,25.1) 116.7,25.1 116.7,23.4 cw(c116.5,23.4) 116.5,23.2 115.5,23.2 cw(c115.5,23.4) 115.3,23.4 115.3,25.1 cw(c115.5,25.1)
  pour cut-out: 29.675,69.575 32.325,69.575 cw(c32.325,69.325) 32.575,69.325 32.575,66.675 cw(c32.325,66.675) 32.325,66.425 29.675,66.425 cw(c29.675,66.675) 29.425,66.675 29.425,69.325 cw(c29.675,69.325)
  pour cut-out: 29.675,33.575 32.325,33.575 cw(c32.325,33.325) 32.575,33.325 32.575,30.675 cw(c32.325,30.675) 32.325,30.425 29.675,30.425 cw(c29.675,30.675) 29.425,30.675 29.425,33.325 cw(c29.675,33.325)
  pour cut-out: 16.475,69.075 18.125,69.075 cw(c18.125,68.825) 18.375,68.825 18.375,67.175 cw(c18.125,67.175) 18.125,66.925 16.475,66.925 cw(c16.475,67.175) 16.225,67.175 16.225,68.825 cw(c16.475,68.825)
  pour cut-out: 16.475,33.075 18.125,33.075 cw(c18.125,32.825) 18.375,32.825 18.375,31.175 cw(c18.125,31.175) 18.125,30.925 16.475,30.925 cw(c16.475,31.175) 16.225,31.175 16.225,32.825 cw(c16.475,32.825)
  pour cut-out: 83.5,60 88.7,60 cw(c88.7,59.7) 89,59.7 89,54.3 cw(c88.7,54.3) 88.7,54 83.3,54 cw(c83.3,54.3) 83,54.3 83,59.5
  pour cut-out: 136,22.4 137.5,22.4 cw(c137.5,22.1) 137.8,22.1 137.8,18.1 cw(c137.5,18.1) 137.5,17.8 136,17.8 cw(c136,18.1) 135.7,18.1 135.7,22.1 cw(c136,22.1)
  pour cut-out: 15.6,12 51.5,12 cw(c51.5,10.5) 53,10.5 53,5.1 cw(c51.4,5.1) 51.4,3.5 15.6,3.5 cw(c15.6,5.1) 14,5.1 14,10.4 cw(c15.6,10.4)
  pour cut-out: 106,59.7 111.256,54.444 cw(c109.46,52.648) 112,52.648 112,45.075 106.5,45.075 106.5,43.775 105.54,43.775 102.715,46.6 101.693,46.6 101.693,47.916 101.3,48.309 101.3,59.7
  pour cut-out: 55.6,11.9 64,11.9 cw(c64,10.5) 65.4,10.5 65.4,6.7 cw(c64,6.7) 64,5.3 54.8,5.3 cw(c54.8,5.9) 54.2,5.9 54.2,10.5 cw(c55.6,10.5)
  pour cut-out: 29.5,74.3 30.4,74.3 30.4,72.4 29.459,72.4
  pour cut-out: 29.5,38.3 30.469,38.3 30.469,36.4 29.459,36.4
  pour cut-out: 14.9,63.3 18.7,63.3 18.7,62.1 18.4,61.8 16.455,61.8 15.87,61.216 15.87,60.238 15.542,60.238 15.504,60.2 15.47,60.234 15.47,60.771 15.376,60.771 14.854,61.293
  pour cut-out: 14.9,27.3 18.7,27.3 18.7,26.1 18.4,25.8 16.455,25.8 15.87,25.216 15.87,24.238 15.542,24.238 15.504,24.2 15.47,24.234 15.47,24.771 15.376,24.771 14.854,25.293
  pour cut-out: 12.008,24.064 13.864,24.064 13.8,24 13.8,20.6 12,20.6 11.9,20.7
  pour cut-out: 12.008,60.064 13.864,60.064 13.8,60 13.8,56.6 12,56.6 11.9,56.7
  pour cut-out: 4.7,66.6 4.7,63.1 5.7,62.1 8.15,64.55 8.15,66.8
  pour cut-out: 4.7,48.6 4.7,45.1 5.7,44.1 8.15,46.55 8.15,48.8
  pour cut-out: 4.7,30.6 4.7,27.1 5.7,26.1 8.15,28.55 8.15,30.8
  pour cut-out: 3.6,71.6 6,71.6 7.7,69.9 9.9,69.9 9.9,69.55 11.417,68.033 11.417,67.024 9.776,67.024 9.1,67.7 8.8,67.4 7.454,67.4 7.212,67.158 7.212,66.442 6.899,66.442 6.041,67.3 4,67.3 3.3,68
  pour cut-out: 3.6,53.6 6,53.6 7.7,51.9 9.9,51.9 9.9,51.55 11.417,50.033 11.417,49.024 9.776,49.024 9.1,49.7 8.8,49.4 7.454,49.4 7.212,49.158 7.212,48.442 6.899,48.442 6.041,49.3 4,49.3 3.3,50
  pour cut-out: 3.6,35.6 6,35.6 7.7,33.9 9.9,33.9 9.9,33.55 11.417,32.033 11.417,31.024 9.776,31.024 9.1,31.7 8.8,31.4 7.454,31.4 7.212,31.158 7.212,30.442 6.899,30.442 6.041,31.3 4,31.3 3.3,32
  pour cut-out: 3.6,17.6 6,17.6 7.7,15.9 9.9,15.9 9.9,15.55 11.417,14.033 11.417,13.024 9.776,13.024 9.1,13.7 8.8,13.4 7.454,13.4 7.212,13.158 7.212,12.442 6.899,12.442 6.041,13.3 4,13.3 3.3,14
  pour cut-out: 118.3,70.9 125.1,70.9 125.1,66.1 123.9,66.1 123.5,66.5 118.3,66.5
  text "Patryk Konieczny - AGH Marines / 4-Channel 10kHz-60kHz ADC system / v1.4 - 17.03.2026" at 15,4.5 h2.35
Layer 1:
  pour cut-out: 134.525,24.025 138.775,24.025 cw(c138.775,23.5) 139.3,23.5 139.3,16.5 cw(c138.8,16.5) 138.8,16 134.5,16 cw(c134.5,16.5) 134,16.5 134,23.5 cw(c134.525,23.5)
  region net GND: 5 vertices and 1 holes, not listed, extent 17.2,3.3 45.1,11.506
  region: 174 vertices and 0 holes, not listed, extent 41.253,7.952 41.678,8.392
  region: 2844 vertices and 0 holes, not listed, extent 17.918,5.256 20.871,9.887
  region: 1819 vertices and 0 holes, not listed, extent 23.34,4.509 26.366,6.385
  region: 2017 vertices and 0 holes, not listed, extent 23.911,8.934 27.391,10.861
  region: 7361 vertices and 3 holes, not listed, extent 20.468,3.85 44.228,9.725
Layer 2:
  pour cut-out: 88,59.392 84.092,59.392 ccw(c84.092,58.9) 83.6,58.9 83.6,55.1 ccw(c84.1,55.1) 84.1,54.6 88,54.6 88,54.76 ccw(c87.76,54.76) 87.76,55 84.24,55 cw(c84.24,55.24) 84,55.24 84,58.7 cw(c84.3,58.7) 84.3,59 87.791,59 cw(c87.791,58.978) 87.814,58.978
  pour cut-out: 91.76,43.4 cw(c91.76,40.86) 94.3,40.86 94.3,39.14 cw(c91.76,39.14) 91.76,36.6 90.14,36.6 cw(c90.14,39.14) 87.6,39.14 87.6,40.86 cw(c90.14,40.86) 90.14,43.4
  pour cut-out: 135.76,43.4 cw(c135.76,40.86) 138.3,40.86 138.3,39.14 cw(c135.76,39.14) 135.76,36.6 134.14,36.6 cw(c134.14,39.14) 131.6,39.14 131.6,40.86 cw(c134.14,40.86) 134.14,43.4
  pour cut-out: 135.76,77.4 cw(c135.76,74.86) 138.3,74.86 138.3,73.14 cw(c135.76,73.14) 135.76,70.6 134.14,70.6 cw(c134.14,73.14) 131.6,73.14 131.6,74.86 cw(c134.14,74.86) 134.14,77.4
  pour cut-out: 91.76,77.4 cw(c91.76,74.86) 94.3,74.86 94.3,73.14 cw(c91.76,73.14) 91.76,70.6 90.14,70.6 cw(c90.14,73.14) 87.6,73.14 87.6,74.86 cw(c90.14,74.86) 90.14,77.4
  pour cut-out: 34.4,44.5 26.2,44.5 26.2,43.5 cw(c26.6,43.5) 26.6,43.9 34.4,43.9
  pour cut-out: 34.4,43.9 34.4,44.5 34.5,44.5 ccw(c34.5,44.9) 34.9,44.9 35.6,44.9 35.6,44.7 cw(c34.8,44.7) 34.8,43.9
  pour cut-out: 34.4,46.8 34.4,46.2 34.5,46.2 cw(c34.5,45.8) 34.9,45.8 35.6,45.8 35.6,46 ccw(c34.8,46) 34.8,46.8
  pour cut-out: 22.5,46.2 34.4,46.2 34.4,46.8 22.5,46.8 ccw(c22.5,46.1) 21.8,46.1 21.8,34.9 22.2,34.9 ccw(c22.2,35.2) 22.5,35.2
  pour cut-out: 26.2,14.5 26.2,44.5 25.9,44.5 ccw(c25.9,44.1) 25.5,44.1 25.5,14.5
  pour cut-out: 21.8,14.5 21.8,33.3 22.2,33.3 cw(c22.2,33) 22.5,33 22.5,14.5
  pour cut-out: 21.7,72.9 cw(c21.7,71.5) 23.1,71.5 23.1,69.1 cw(c22.584,69.1) 22.346,68.642 ccw(c21.7,67.4) 21.7,68.8
  pour cut-out: 103.7,92.8 105.3,92.8 105.3,82.7 ccw(c107.8,82.7) 107.8,80.2 126.16,80.2 ccw(c126.16,82.74) 128.7,82.74 128.7,83.8 129.3,83.8 cw(c129.3,83.5) 129.6,83.5 129.6,82.2 cw(c126.6,82.2) 126.6,79.2 107.6,79.2 cw(c107.6,82.4) 104.4,82.4 104.4,92.1 ccw(c103.7,92.1)
  pour cut-out: 35.6,44.9 35.6,45.8 34.9,45.8 34.9,44.9
Bottom Layer:
  pour cut-out: 27.2,78.7 ccw(c28.407,78.7) 27.554,77.846 28.5,76.9 28.5,75.3 cw(c28.5,76.749) 27.476,75.724 26.4,76.8
  pour cut-out: 29.6,74.6 29.875,74.875 ccw(c29.755,74.996) 29.925,74.996 cw(c29.925,74.08) 30.573,74.727 34.7,70.6 cw(c33.734,69.634) 35.1,69.634 35.1,67.8 cw(c34.617,67.8) 34.959,67.459 34.5,67 33.171,68.329 cw(c33.341,68.5) 33.1,68.5 33.1,70.234 ccw(c31.734,70.234) 32.7,71.2 29.941,73.959 ccw(c29.6,73.617) 29.6,74.1
  pour cut-out: 18.2,71 19.3,71 19.3,73.548 cw(c21.84,73.548) 20.044,75.344 25.188,80.488 ccw(c24.676,81) 25.4,81 ccw(c24.917,81) 25.259,81.341 24.7,81.9 24.144,81.344 cw(c22.348,83.14) 22.348,80.6 20.5,80.6 ccw(c20.5,78.427) 18.964,79.964 17.4,78.4
  pour cut-out: 135.6,23 137.8,23 cw(c137.8,22.7) 138.1,22.7 138.1,17.5 cw(c137.8,17.5) 137.8,17.2 135.6,17.2 cw(c135.6,17.5) 135.3,17.5 135.3,22.7 cw(c135.6,22.7)
  pour cut-out: 23.5,56.8 25.2,56.8 25.3,56.9 25.4,56.8 25.4,42.2 23.3,42.2
  pour cut-out: 30.2,39.2 29.5,38.5 29.5,37.7 30.1,37.7 32.86,34.94 32.86,32.64 34.5,31 35.2,31.7 35.2,34.4
  pour cut-out: 119.4,73.2 119.4,73.7 120.4,74.7 122.8,74.7 122.8,71.9 120.3,71.9
  pour cut-out: 101.4,59.7 104.6,59.7 114.1,50.2 114.1,45.2 110.4,45.2 110.3,45.3 110.3,49.5 102.4,57.4 101.433,57.4
  pour cut-out: 103,49.1 105.1,49.1 108.7,45.5 107,43.8 107,39.8 108.9,37.9 104.2,37.9 104.2,44.1 103.2,45.1 102.2,45.1 102.2,48.3
  pour cut-out: 89.75,52.8 90.3,52.8 92.5,50.6 92.5,47.6 96.3,43.8 94.5,42 94.5,42.2 89.9,46.8
  text "https://github.com/konpferd/ADC_system_TE0720" at 12.3,85.6 h1.52

## Silkscreen, mask and mechanical layers (free items; w line width, h text height)
Top Overlay:
  drawing of 249 lines, arcs and shapes, not listed
  text "4" at 77.75,96.9 h1.5 r90
  text "3" at 79.75,96.9 h1.5 r90
  text "2" at 81.75,96.9 h1.5 r90
  text "1" at 83.75,96.9 h1.5 r90
  text "PWR_M3" at 132.2,93.599 h1.5
  text "PWR_M2" at 132.2,91.599 h1.5
  text "PWR_M1" at 132.2,89.599 h1.5
  text "User LEDs" at 74.6,81.725 h2.5
  text "Put that back!!!" at 40.65,77.641 h1.25
  text "Put that back!!!" at 55.05,77.641 h1.25
  text "CH4" at 31.8,77.225 h2.5
  text "5VA" at 78.4,67.599 h1.5
  text "JM1" at 98.45,67.425 h2.5
  text "Analog Set 2" at 40.55,67.042 h1.75
  text "Put that back!!!" at 40.65,57.641 h1.25
  text "Put that back!!!" at 55.05,57.641 h1.25
  text "CH3" at 31.8,57.225 h2.5
  text "JM3" at 129.975,47.4 h2.5 r90
  text "Designed for Trenz-Electronic TE0720 SoM series" at 146.35,45.3 h1.6 r90
  text "JM2" at 98.4,45.025 h2.5
  text "VOCM" at 78.7,42.699 h1.5
  text "Put that back!!!" at 40.65,41.641 h1.25
  text "Put that back!!!" at 55.05,41.641 h1.25
  text "CH2" at 31.8,41.225 h2.5
  text "https://wiki.trenz-electronic.de/display/PD/TE0720+Resources" at 146.4,37.9 h1.52 r90
  text "3.3VD" at 111.1,32.899 h1.5
  text "NRST" at 71.9,32.025 h2.5
  text "1.8VD" at 121.2,31.899 h1.5
  text "Analog Set 1" at 40.55,31.042 h1.75
  text "3.3V PWR" at 137.6,25.986 h1.5
  text "Put that back!!!" at 40.65,21.641 h1.25
  text "Put that back!!!" at 55.05,21.641 h1.25
  text "CH1" at 31.8,21.225 h2.5
  text "JTAG" at 78.175,20.6 h2.5 r90
  text "VREF" at 82.05,16.075 h1.5 r90
  text "TMS" at 83.75,16.075 h1.5 r90
  text "TCK" at 85.45,16.075 h1.5 r90
  text "TDO" at 87.15,16.075 h1.5 r90
  text "TDI" at 88.85,16.075 h1.5 r90
  text "NC" at 90.55,16.075 h1.5 r90
  text "NRST" at 92.25,16.075 h1.5 r90
  text "VCC" at 134.2,12.199 h1.5
  text "GND" at 82.05,11.875 h1.5 r90
  text "GND" at 83.75,11.875 h1.5 r90
  text "GND" at 85.45,11.875 h1.5 r90
  text "GND" at 87.15,11.875 h1.5 r90
  text "GND" at 88.85,11.875 h1.5 r90
  text "GND" at 90.55,11.875 h1.5 r90
  text "GND" at 92.25,11.875 h1.5 r90
  text "PG" at 134.2,10.199 h1.5
  text "12V" at 98.24,9.166 h2.5
  text "5V" at 122.9,9.125 h2.5
  text "12VA" at 67.2,6.199 h1.5
Bottom Overlay:
  drawing of 1859 lines, arcs and shapes, not listed
  text "Github page" at 26.51,97.334 h2 r90
  text "USB 2.0" at 98.972,86.841 h2
  text "Analog IN 4" at 13.91,82.968 h2 r90
  text "1Gb Ethernet" at 129.1,77.741 h2
  text "Analog IN 3" at 13.91,64.968 h2 r90
  text "Analog IN 2" at 13.91,46.968 h2 r90
  text "Analog IN 1" at 13.91,28.968 h2 r90
  text "MAX 1A" at 97.866,15.81 h2 r180
  text "MAX 8A" at 121.066,15.81 h2 r180
  text "12V Power IN" at 97.532,13.01 h2 r180
  text "5V Power IN" at 120.632,13.01 h2 r180
Top Solder:
  region: 14.2,10.3 14.2,5.2 ccw(c15.7,5.2) 15.7,3.7 51.3,3.7 ccw(c51.3,5.2) 52.8,5.2 52.8,10.4 ccw(c51.4,10.4) 51.4,11.8 15.7,11.8 ccw(c15.7,10.3)
Mechanical 1:
  the board outline again, w0.5

## Text inside footprints (layer, text, board x,y; h text height)
DES1: Top Overlay "Unit number" at 53.7,3.176 h1.75